# Altium PCB MP3_Player.PcbDoc (part 1 of 2)
Units mm, origin at the board's own origin, x right, y up, seen from the top; angles counter-clockwise.
Board outline 65.25 x 90.42 mm, 2 copper layers (Top Layer, Bottom Layer), stack 1.581 mm thick; 93 components, 53 nets, 312 pads, 294 vias.
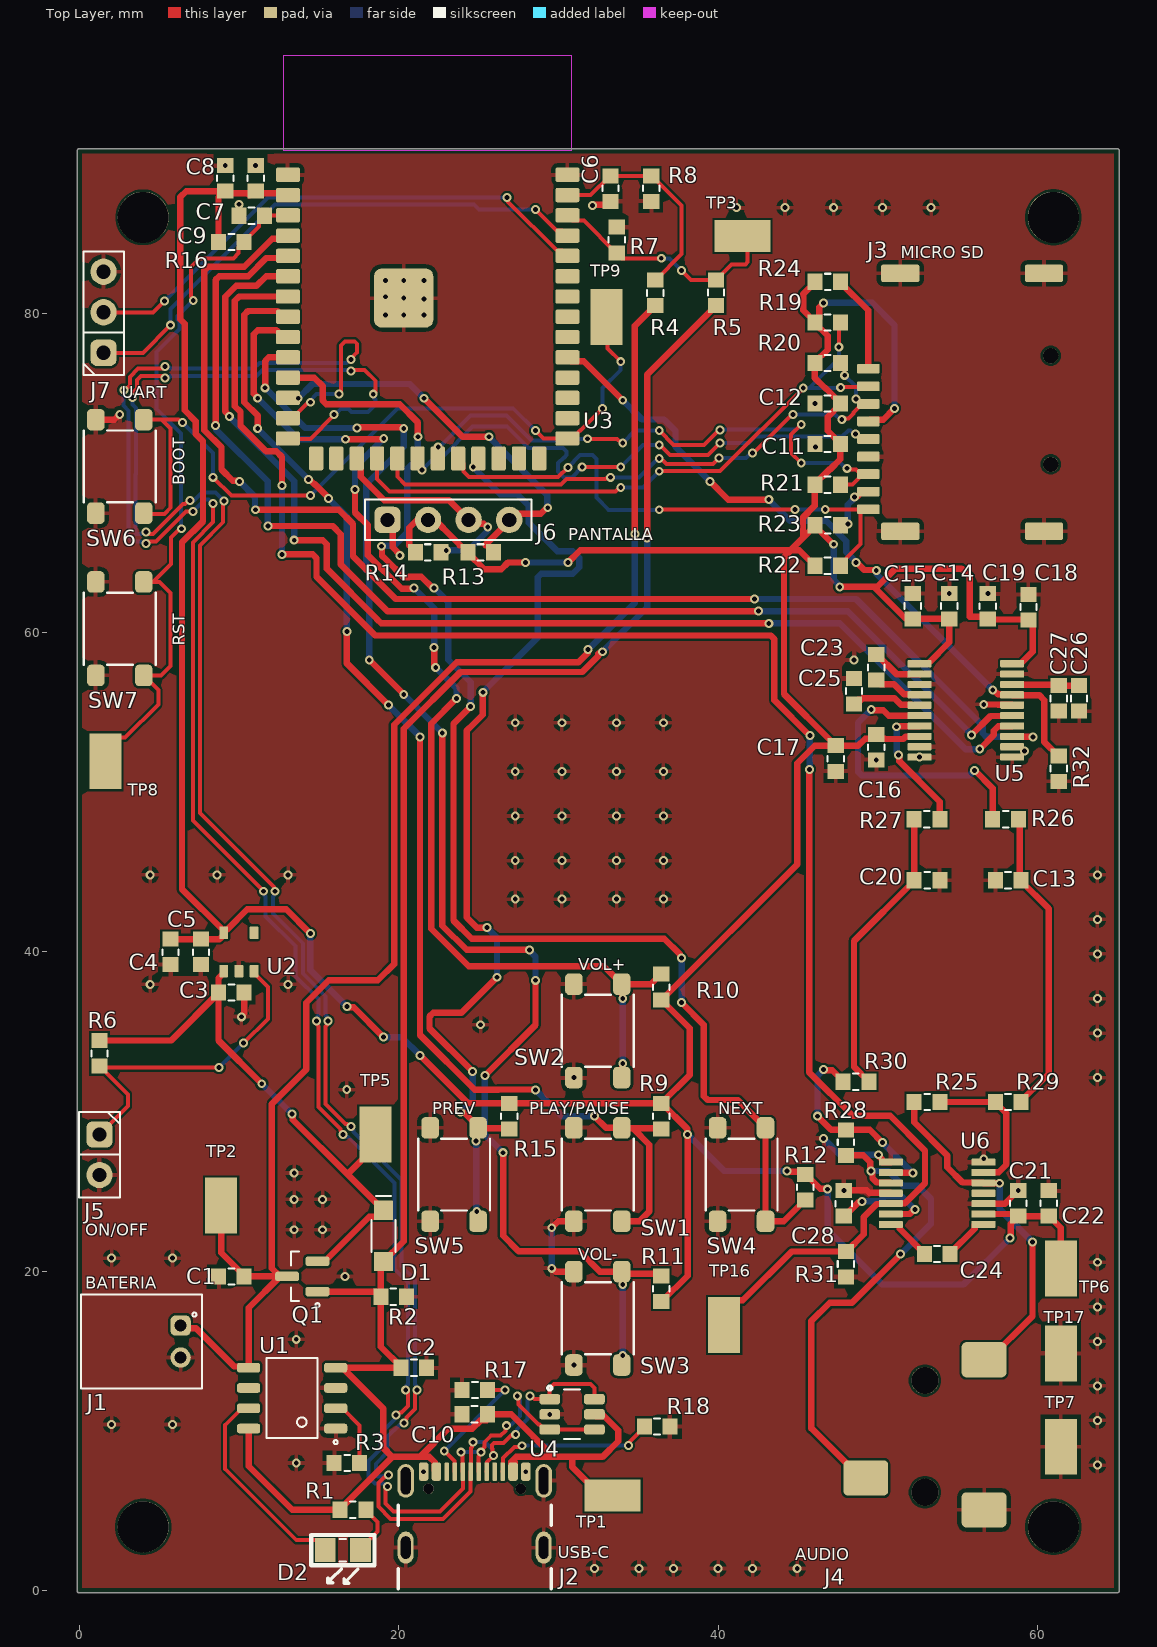
[diagram p0: Top Layer view]
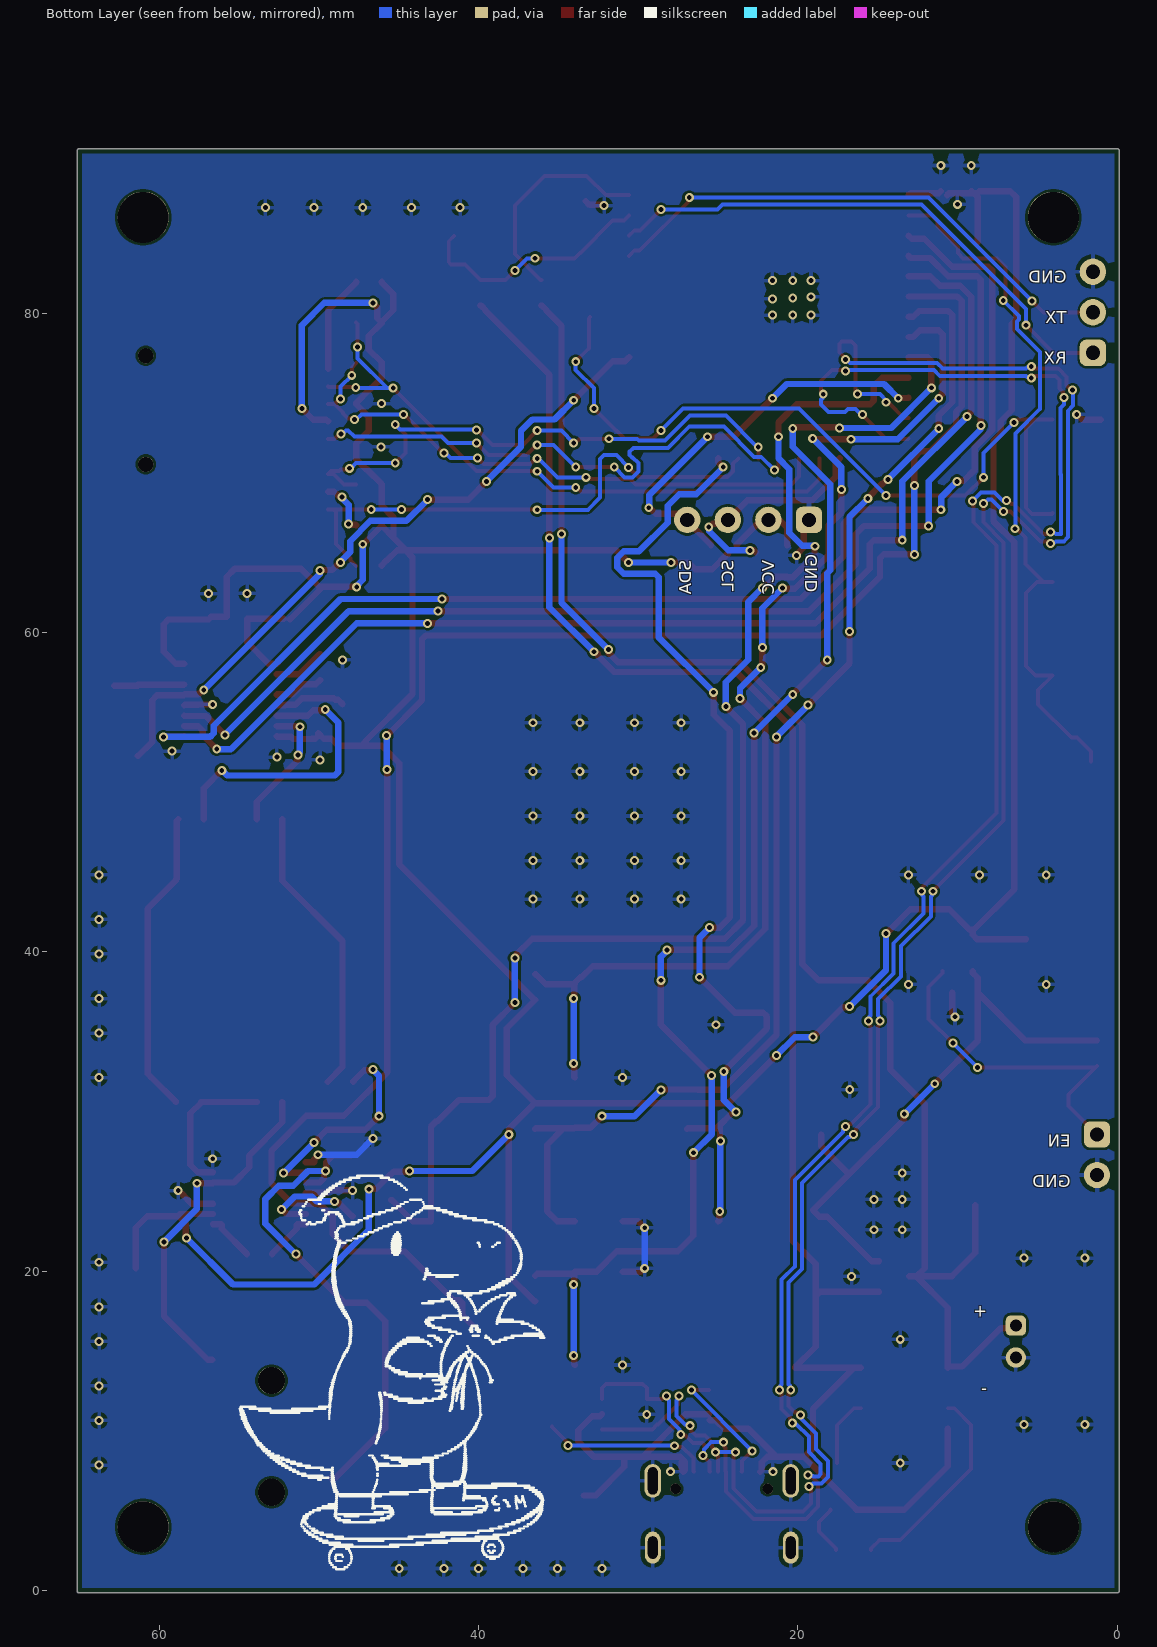
[diagram p1: Bottom Layer view, seen from below]
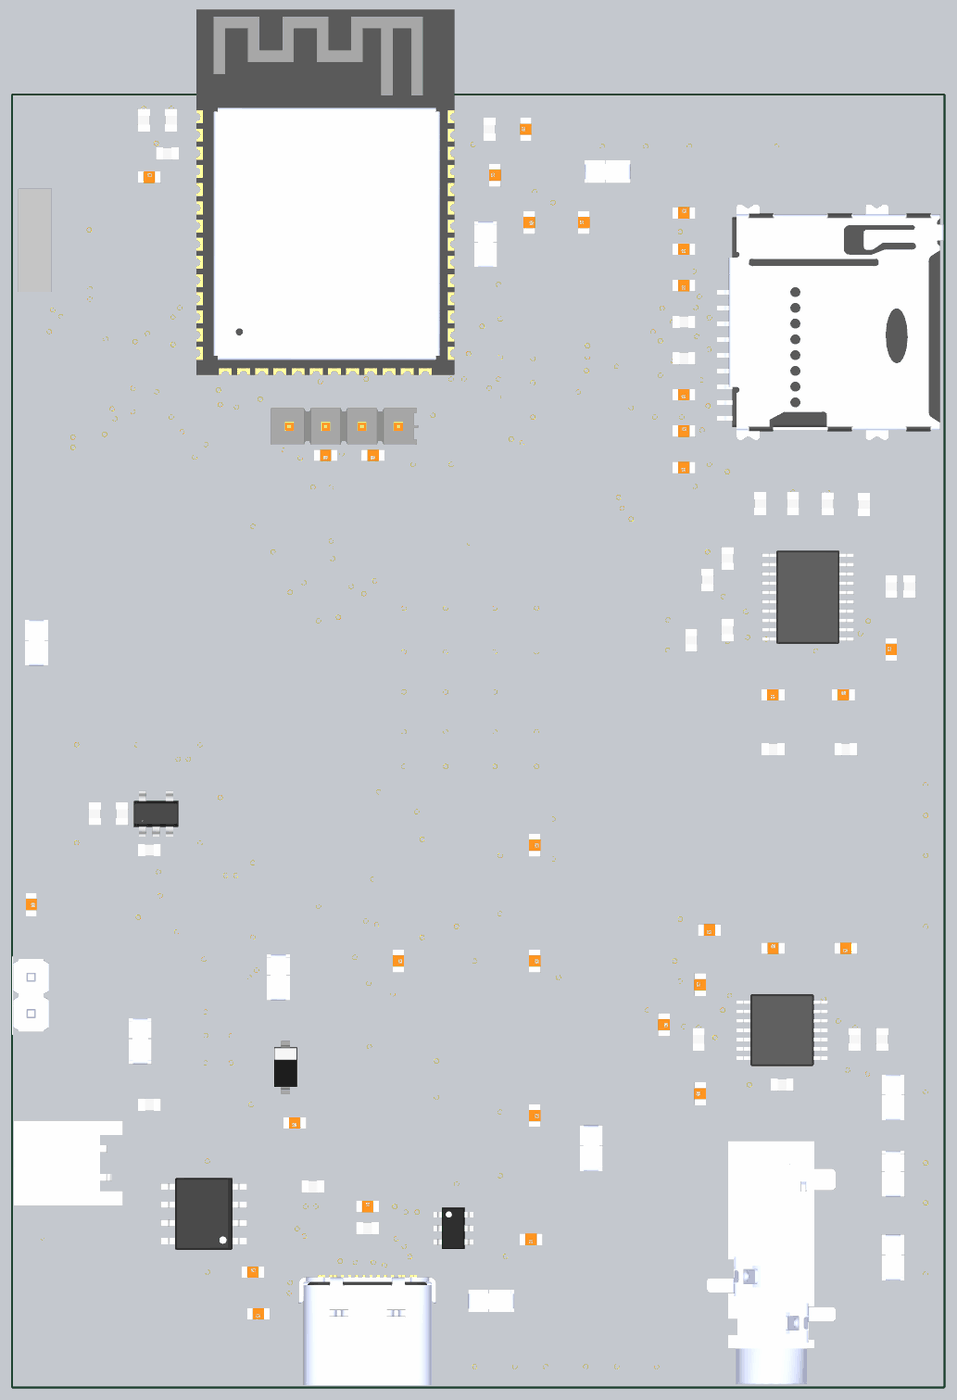
[diagram p3: 3D render of the assembled board from above, using the file's embedded part models]

## Layer stack, top to bottom
Top Solder: solder mask 0.0102, Solder Resist, Dk 3.5
Top Layer: signal copper 0.0356
Dielectric 1: dielectric 1.51, FR-4, Dk 4.8
Bottom Layer: signal copper 0.0356
Bottom Solder: solder mask 0.0102, Solder Resist, Dk 3.5

## Board outline
0,-0.127 cw(c0,0) -0.127,0 -0.127,90.17 cw(c0,90.17) 0,90.297 65,90.297 cw(c65,90.17) 65.127,90.17 65.127,0 cw(c65,0) 65,-0.127

## Design rules (kind name [scope] priority, off if disabled: settings)
BoardOutlineClearance BoardOutline_EdgeParts [InComponent('U3') or InComponent('J1') or InComponent('J2') or InComponent('J3') or InComponent('J4') or InComponent('J5')] p1: gap=0 ignorepadtopadclearanceinfootprint=FALSE
BoardOutlineClearance [All] p2: gap=0.3 ignorepadtopadclearanceinfootprint=FALSE
Clearance Clearance_USB [InComponent('J2')] p1: gap=0.15 ignorepadtopadclearanceinfootprint=FALSE
Clearance [All] p2: gap=0.152 ignorepadtopadclearanceinfootprint=FALSE
DiffPairsRouting DiffPair_USB [InDifferentialPair('USB')] p1: maxlimit=0.2 minlimit=0.2 mostfreqgap=0.2 toplayer_minwidth=0.25 toplayer_maxwidth=0.25 toplayer_prefwidth=0.25 bottomlayer_minwidth=0.25 bottomlayer_maxwidth=0.25 bottomlayer_prefwidth=0.25 maxuncoupledlength=50
HoleSize [All] p1: absolutevalues=TRUE maxlimit=5.08 minlimit=0.305 maxpercent=80.000 minpercent=20.000
MinimumSolderMaskSliver [All] p1: minsoldermaskwidth=0.076
PolygonConnect PolygonConnect_Vias [IsVia] p1: thpad.connectstyle=Direct thpad.reliefconductorwidth=0.254 thpad.reliefentries=4 thpad.polygonreliefangle="90 Angle" thpad.airgapwidth=0.254 smdpad.connectstyle=Relief smdpad.reliefconductorwidth=0.254 smdpad.reliefentries=4 smdpad.polygonreliefangle="90 Angle" smdpad.airgapwidth=0.254 via.connectstyle=Relief via.reliefconductorwidth=0.254 via.reliefentries=4 via.polygonreliefangle="90 Angle" via.airgapwidth=0.254
PolygonConnect [All] p2: connectstyle=Relief reliefconductorwidth=0.254 reliefentries=4 polygonreliefangle="90 Angle" airgapwidth=0.254
RoutingVias [All] p1: holewidth=0.305 width=0.559 viastyle="Through Hole" minholewidth=0.305 minwidth=0.457 maxholewidth=0.762 maxwidth=1.016
SilkToSilkClearance [All] p1: silktosilkclearance=0.051
SilkToSolderMaskClearance [IsPad] p1: minsilkscreentomaskgap=0.05 clearancetoexposedcopper=TRUE
SolderMaskExpansion SolderMaskExpansion_Via [isvia] p1: expansion=0.051 istentingtop=TRUE
SolderMaskExpansion [All] p2: expansion=0.051 istentingtop=FALSE
SupplyNets "Schematic Supply Nets_4" [InNet('VBUS')] p1: voltage=0.000
SupplyNets "Schematic Supply Nets_3" [InNet('+3V3')] p2: voltage=0.000
SupplyNets "Schematic Supply Nets_2" [InNet('VBAT')] p3: voltage=0.000
SupplyNets "Schematic Supply Nets_1" [InNet('GND')] p4: voltage=0.000
SupplyNets "Schematic Supply Nets" [InNet('EN')] p5: voltage=0.000
Width Width_Power [InNet('VBUS') or InNet('VBAT') or InNet('VSYS') or InNet('+3V3')] p1: maxlimit=1.5 minlimit=0.4 preferedwidth=0.6
Width Width_GND [InNet('GND')] p2: maxlimit=1.5 minlimit=0.4 preferedwidth=0.5
Width [All] p3: maxlimit=1 minlimit=0.152 preferedwidth=0.25
25 further rules are at their usual default settings.

## Classes and differential pairs
component class U_60_User_Interface: J6 R9 R10 R11 R12 R13 R14 R15 SW1 SW2 SW3 SW4 SW5
component class U_50_Audio_Codec: C13 C14 C15 C16 C17 C18 C19 C20 C21 C22 C23 C24 C25 C26 C27 C28 J4 R25 R26 R27 R28 R29 R30 R31 R32 TP16 TP17 U5 U6
component class U_40_Storage: C11 C12 J3 R19 R20 R21 R22 R23 R24
component class U_30_USB_Interface: C10 J2 R17 R18 U4
component class U_20_MCU_Core: C7 C8 C9 J7 R16 SW6 SW7 TP8 TP9 U3
component class U_10_Power_Management: C1 C2 C3 C4 C5 C6 D1 D2 J1 J5 Q1 R1 R2 R3 R4 R5 R6 R7 R8 TP1 TP2 TP3 TP5 TP6 TP7 U1 U2
differential pair USB: +USB_DP -USB_DN

## Components (designator, comment, footprint, x,y, rotation, side; value= is the part's Value field where it differs from the comment)
C1 "10uF 10V" 0603_cap 9.525,19.685 r0 top value=10uF
C2 "10uF 10V" 0603_cap 20.955,13.97 r0 top value=10uF
C3 "10uF 10V" 0603_cap 9.525,37.465 r0 top value=10uF
C4 "10uF 10V" 0603_cap 5.715,40.005 r270 top value=10uF
C5 "0.1uF 50V" 0603_cap 7.62,40.005 r270 top value=0.1uF
C6 "0.1uF 50V" 0603_cap 33.274,87.804 r90 top value=0.1uF
C7 "0.1uF 50V" 0603_cap 11.049,88.439 r90 top value=0.1uF
C8 "10uF 10V" 0603_cap 9.144,88.439 r90 top value=10uF
C9 "1uF 50V" 0603_cap 10.795,86.106 r180 top value=1uF
C10 "0.1uF 50V" 0603_cap 24.765,11.049 r180 top value=0.1uF
C11 "0.1uF 50V" 0603_cap 46.863,71.802 r180 top value=0.1uF
C12 "10uF 10V" 0603_cap 46.863,74.342 r180 top value=10uF
C13 "2.2nF" 0603_cap 58.166,44.497 r180 top
C14 "0.1uF 50V" 0603_cap 54.483,61.658 r90 top value=0.1uF
C15 "10uF 10V" 0603_cap 52.197,61.658 r90 top value=10uF
C16 "0.1uF 50V" 0603_cap 49.911,52.832 r270 top value=0.1uF
C17 "10uF 10V" 0603_cap 47.371,52.117 r270 top value=10uF
C18 "0.1uF 50V" 0603_cap 59.436,61.595 r90 top value=0.1uF
C19 "10uF 10V" 0603_cap 56.896,61.642 r90 top value=10uF
C20 "2.2nF" 0603_cap 53.086,44.497 r0 top
C21 "0.1uF 50V" 0603_cap 58.801,24.257 r90 top value=0.1uF
C22 "1uF 50V" 0603_cap 60.706,24.257 r90 top value=1uF
C23 "2.2uF" 0603_cap 49.911,57.832 r270 top
C24 "1uF 50V" 0603_cap 53.721,21.082 r180 top value=1uF
C25 "2.2uF" 0603_cap 48.514,56.325 r90 top
C26 "10uF 10V" 0603_cap 62.611,55.88 r270 top value=10uF
C27 "0.1uF 50V" 0603_cap 61.341,55.88 r270 top value=0.1uF
C28 "1uF 50V" 0603_cap 47.879,24.257 r270 top value=1uF
D1 "40V 1A" SOD_123 19.05,22.225 r270 top
D2 "2V" 0805_LED 16.51,2.54 r180 top
J1 "Connector 2pos" CON_2x1_TH_2MM 6.35,15.605 r270 top
J2 "USB C" CON_USB_C_16P_RA 24.765,5.08 r0 top
J3 "MEM2075-00-140-01-A" MicroSD_GCT_MEM2075-00-140-01-A 54.913,74.417 r90 top
J4 "SJ-3523-SMT" Jack_3.5mm_SameSky_SJ-3523-SMT 52.959,2.667 r0 top
J5 "2x1" H_2x1_TH_100mil 1.27,27.305 r270 top
J6 "4x1" H_4x1_TH_2.54mm 23.114,67.056 r0 top
J7 "3x1" H_3X1_TH_100mil 1.524,80.057 r90 top
Q1 "P CH" SOT_23_3 13.97,19.685 r180 top
R1 "1k 1/10W" 0603_res 17.145,5.08 r180 top value=1k
R2 "49k9 1/10W" 0603_res 19.685,18.415 r180 top value=49k9
R3 "4k7 1/10W" 0603_res 16.764,8.001 r0 top value=4k7
R4 "390k 1/10W" 0603_res 36.068,81.28 r270 top value=390k
R5 "390k 1/10W" 0603_res 39.878,81.28 r90 top value=390k
R6 "10k 1/10W" 0603_res 1.27,33.655 r270 top value=10k
R7 "390k 1/10W" 0603_res 33.655,84.582 r90 top value=390k
R8 "390k 1/10W" 0603_res 35.814,87.804 r90 top value=390k
R9 "10k 1/10W" 0603_res 36.449,29.718 r270 top value=10k
R10 "10k 1/10W" 0603_res 36.449,37.808 r270 top value=10k
R11 "10k 1/10W" 0603_res 36.449,18.923 r270 top value=10k
R12 "10k 1/10W" 0603_res 45.466,25.273 r270 top value=10k
R13 "4k7 1/10W" 0603_res 25.146,65.024 r180 top value=4k7
R14 "4k7 1/10W" 0603_res 21.844,65.024 r180 top value=4k7
R15 "10k 1/10W" 0603_res 26.924,29.718 r270 top value=10k
R16 "10k 1/10W" 0603_res 9.525,84.455 r0 top value=10k
R17 "4k7 1/10W" 0603_res 24.765,12.573 r0 top value=4k7
R18 "4k7 1/10W" 0603_res 36.195,10.287 r180 top value=4k7
R19 "10k 1/10W" 0603_res 46.863,79.422 r180 top value=10k
R20 "10k 1/10W" 0603_res 46.863,76.882 r180 top value=10k
R21 "10k 1/10W" 0603_res 46.863,69.262 r180 top value=10k
R22 "10k 1/10W" 0603_res 46.863,64.182 r180 top value=10k
R23 "10k 1/10W" 0603_res 46.863,66.722 r0 top value=10k
R24 "10k 1/10W" 0603_res 46.863,81.962 r0 top value=10k
R25 "10k 1/10W" 0603_res 53.086,30.607 r0 top value=10k
R26 "470R" 0603_res 58.001,48.307 r0 top
R27 "470R" 0603_res 53.086,48.307 r180 top
R28 "10k 1/10W" 0603_res 48.006,28.067 r90 top value=10k
R29 "10k 1/10W" 0603_res 58.166,30.607 r180 top value=10k
R30 "10k 1/10W" 0603_res 48.641,31.877 r180 top value=10k
R31 "100k" 0603_res 48.006,20.447 r90 top
R32 "10k 1/10W" 0603_res 61.341,51.482 r90 top value=10k
SW1 "Sw" Sw_PUSH_4.5x4.5x5mm 32.474,26.063 r90 top
SW2 "Sw" Sw_PUSH_4.5x4.5x5mm 32.474,35.063 r90 top
SW3 "Sw" Sw_PUSH_4.5x4.5x5mm 32.474,17.063 r90 top
SW4 "Sw" Sw_PUSH_4.5x4.5x5mm 41.474,26.063 r90 top
SW5 "Sw" Sw_PUSH_4.5x4.5x5mm 23.474,26.063 r90 top
SW6 "Sw" Sw_PUSH_4.5x4.5x5mm 2.54,70.405 r90 top
SW7 "Sw" Sw_PUSH_4.5x4.5x5mm 2.54,60.245 r270 top
TP1 "Test Point" "Test Point" 33.401,5.969 r180 top
TP2 "Test Point" "Test Point" 8.89,24.13 r90 top
TP3 "Test Point" "Test Point" 41.529,84.836 r180 top
TP5 "Test Point" "Test Point" 18.542,28.575 r90 top
TP6 "Test Point" "Test Point" 61.468,20.193 r90 top
TP7 "Test Point" "Test Point" 61.468,9.017 r90 top
TP8 "Test Point" "Test Point" 1.651,51.943 r90 top
TP9 "Test Point" "Test Point" 33.02,79.756 r90 top
TP16 "Test Point" "Test Point" 40.386,16.637 r90 top
TP17 "Test Point" "Test Point" 61.468,14.859 r90 top
U1 "4.2V 1A" SOIC_8_3.9mm 13.335,12.065 r180 top
U2 "AP2112K-3.3TRG1" SOT-23-5 10,40 r0 top
U3 "ESP32-S3-WROOM-1-N16R8" ESP32-S3-WROOM-1 21.82,79.786 r0 top
U4 "USBLC6-2SC6" SOT_23_6 30.861,11.049 r0 top
U5 "PCM5102APWR" TSSOP-20_4.4x6.5mm_P0.65mm 55.521,55.127 r0 top
U6 "TPA6138A2PWR" TSSOP-14_4.4x5mm_P0.65mm 53.721,24.892 r0 top

## Footprints (in the part's own frame and the unit in brackets; to place one, negate y for a bottom-side part, rotate by r counter-clockwise, add the part's x,y. Pads: shape width x height; smd on the part's side, far side on the other; paste and mask are expansions set on the pad)
0603_cap [mil]
  rect 37x40 smd: 1(-31.5,0) 2(31.5,0)
  silkscreen extent -6,-20 8,20, body extent -31,-17 31,17, height 34
0603_res [mil] "1608 Metric / 20190225 / C-A.Serna.A"
  rect 37x40 smd: 1(-31.5,0) 2(31.5,0)
  silkscreen extent -7,-20 8,20, body extent -31,-16 32,16, height 12
0805_LED [mm]
  rect 1.3x1.5 smd: 1(-1.1,0) 2(1.1,0)
  silkscreen extent -1.98,-0.97 1.98,2.07, body extent -1,-0.62 1,0.63, height 1.1
CON_2x1_TH_2MM [mm] "/20190307/N-A.Potosi"
  rrect50% 1.27x1.27 hole 0.762: 1(-1,0)
  round 1.27 hole 0.762: 2(1,0)
  silkscreen extent -2.95,-6.25 2.95,1.35, body extent -2.96,-6.27 2.94,1.33, height 4.8
CON_USB_C_16P_RA [mm]
  oval 1x2 hole 0.6 slot 1.4 at 90 deg: 0(-4.32,-2.377) 0(4.32,-2.377)
  oval 1.05x2.1 hole 0.6 slot 1.7 at 90 deg: 0(-4.32,1.803) 0(4.32,1.803)
  rrect50% 0.6x1.15 smd: A1/B12(-3.2,2.378) A4/B9(-2.4,2.378) B1/A12(3.2,2.378) B4/A9(2.4,2.378)
  rrect50% 0.3x1.15 smd: A5(-1.25,2.378) A6(-0.25,2.378) A7(0.25,2.378) A8(1.25,2.378) B5(1.75,2.378) B6(0.75,2.378) B7(-0.75,2.378) B8(-1.75,2.378)
  round 0.65 hole 0.65 unplated: ""(-2.89,1.303) ""(2.89,1.303)
  silkscreen extent -4.79,-4.98 4.79,0.27, body extent -4.79,-4.98 4.79,2.73, height 3.31
ESP32-S3-WROOM-1 [mm] "Espressif ESP32-S3-WROOM-1 module, 18x25.5mm, 41 pads; land pattern per datasheet v1.8 Fig.11-1. Keep copper out of antenna area."
  rrect25% 1.5x0.9 smd: 1(-8.75,8.88) 2(-8.75,7.61) 3(-8.75,6.34) 4(-8.75,5.07) 5(-8.75,3.8) 6(-8.75,2.53) 7(-8.75,1.26) 8(-8.75,-0.01) 9(-8.75,-1.28) 10(-8.75,-2.55) 11(-8.75,-3.82) 12(-8.75,-5.09) 13(-8.75,-6.36) 14(-8.75,-7.63) 27(8.75,-7.63) 28(8.75,-6.36) 29(8.75,-5.09) 30(8.75,-3.82) 31(8.75,-2.55) 32(8.75,-1.28) 33(8.75,-0.01) 34(8.75,1.26) 35(8.75,2.53) 36(8.75,3.8) 37(8.75,5.07) 38(8.75,6.34) 39(8.75,7.61) 40(8.75,8.88)
  rrect25% 0.9x1.5 smd: 15(-6.985,-8.88) 16(-5.715,-8.88) 17(-4.445,-8.88) 18(-3.175,-8.88) 19(-1.905,-8.88) 20(-0.635,-8.88) 21(0.635,-8.88) 22(1.905,-8.88) 23(3.175,-8.88) 24(4.445,-8.88) 25(5.715,-8.88) 26(6.985,-8.88)
  rrect25% 3.7x3.7 smd: 41(-1.5,1.16)
  Top Layer keep-out region: -9,16.37 9,16.37 9,10.37 -9,10.37
  body extent -9,-9.13 9,16.37, height 3.26
H_2x1_TH_100mil [mil]
  rrect50% 65x65 hole 35: 1(-50,0)
  round 65 hole 35: 2(50,0)
  silkscreen extent -105,-50 105,50, body extent -101,-49 99,49, height 339
H_3X1_TH_100mil [mil]
  rrect50% 65x65 hole 35: 1(-100,0)
  round 65 hole 35: 2(0,0) 3(100,0)
  silkscreen extent -155,-50 150,50, body extent -142,-46 142,46, height 320
H_4x1_TH_2.54mm [mil]
  rrect50% 65x65 hole 35: 1(-150,0)
  round 65 hole 35: 2(-50,0) 3(50,0) 4(150,0)
  silkscreen extent -205,-50 205,50, body extent -200,-50 205,50, height 420
Jack_3.5mm_SameSky_SJ-3523-SMT [mm] "Same Sky SJ-3523-SMT 3.5mm stereo jack: 1=sleeve 2=tip 3=ring (datasheet 04/15/2025). Barrel faces -Y."
  rrect25% 2.8x2.2 smd: 1(3.7,2.4) 2(3.7,11.8) 3(-3.7,4.4)
  round 1.7 / inner round 0 / far side round 1.7 hole 1.7 unplated: NP1(0,3.5) NP2(0,10.5)
  body extent -4.5,-2.5 4.5,14.5, height 5.01
MicroSD_GCT_MEM2075-00-140-01-A [mm] "GCT MEM2075 microSD push-push, 1.4mm profile, normally-open card detect CD to shell (G). Drawing rev A1. Card inserts from -Y edge."
  rrect25% 0.62x1.4 smd: 1(2.105,5.5) 2(1.005,5.5) 3(-0.095,5.5) 4(-1.195,5.5) 5(-2.295,5.5) 6(-3.395,5.5) 7(-4.495,5.5) 8(-5.595,5.5) CD(-6.695,5.5)
  rrect25% 1.1x2.4 smd: G1(-8.075,3.5) G2(-8.075,-5.5) G3(8.075,3.5) G4(8.075,-5.5)
  round 0.95 / inner round 0 / far side round 0.95 hole 0.95 unplated: NP1(2.915,-5.92) NP2(-3.885,-5.92)
  body extent -8.31,-10.08 8.13,5.77, height 1.46
SOD_123 [mm]
  rect 1.2x1.2 smd: 1(-1.6,0) 2(1.6,0)
  silkscreen extent -2.5,-0.75 1,0.75, body extent -1.93,-0.8 1.77,0.8, height 1.28
SOIC_8_3.9mm [mm]
  rrect50% 1.45x0.6 smd: 1(-2.725,1.905) 2(-2.725,0.635) 3(-2.725,-0.635) 4(-2.725,-1.905) 5(2.725,-1.905) 6(2.725,-0.635) 7(2.725,0.635) 8(2.725,1.905)
  silkscreen extent -2.85,-2.5 1.6,2.88, body extent -3.01,-2.5 3.01,2.5, height 1.73
SOT-23-5 [mm] "SOT-23-5 / SOT25, land per Diodes AP2112 datasheet DS39724 (pads 0.55 x 0.80, rows 2.40, pitch 0.95). Used by AP2112K and MCP73831."
  rrect25% 0.55x0.8 smd: 1(-0.95,-1.2) 2(0,-1.2) 3(0.95,-1.2) 4(0.95,1.2) 5(-0.95,1.2)
  body extent -1.55,-1.6 1.55,1.6, height 1.45
SOT_23_3 [mm]
  rrect50% 1.5x0.6 smd: 1(-0.95,0.95) 2(-0.95,-0.95) 3(0.95,0)
  silkscreen extent -1.07,-1.55 0.7,1.92, body extent -0.7,-1.52 0.7,1.53, height 1.12
SOT_23_6 [mm]
  rrect50% 1.3x0.65 smd: 1(-1.4,0.95) 2(-1.4,0) 3(-1.4,-0.95) 4(1.4,-0.95) 5(1.4,0) 6(1.4,0.95)
  silkscreen extent -1.52,-1.55 0.5,1.78, body extent -1.5,-1.45 1.3,1.45, height 1.45
Sw_PUSH_4.5x4.5x5mm [mm]
  rrect50% 1.35x1.1 smd: 1(-2.925,1.5) 1(2.925,1.5) 2(-2.925,-1.5) 2(2.925,-1.5)
  silkscreen extent -2.25,-2.25 2.25,2.25, body extent -2.25,-2.25 2.25,2.25, height 5
"Test Point" [mm]
  rect 3.5x2 smd: 1(0,0)
  body extent -1.6,-0.8 1.6,0.8, height 2.01
TSSOP-14_4.4x5mm_P0.65mm [mm] "TI PW0014A TSSOP-14, 4.4 mm body, pitch 0.65; land per SLOS704B example board layout (pads 1.5 x 0.45, rows 5.8 mm)."
  rrect25% 1.5x0.45 smd: 1(-2.9,1.95) 2(-2.9,1.3) 3(-2.9,0.65) 4(-2.9,0) 5(-2.9,-0.65) 6(-2.9,-1.3) 7(-2.9,-1.95) 8(2.9,-1.95) 9(2.9,-1.3) 10(2.9,-0.65) 11(2.9,0) 12(2.9,0.65) 13(2.9,1.3) 14(2.9,1.95)
  body extent -3.2,-2.5 3.2,2.5, height 1.13
TSSOP-20_4.4x6.5mm_P0.65mm [mm] "TI PW0020A TSSOP-20, 4.4 mm body, pitch 0.65; land per SLAS859C example board layout (pads 1.5 x 0.45, rows 5.8 mm)."
  rrect25% 1.5x0.45 smd: 1(-2.9,2.925) 2(-2.9,2.275) 3(-2.9,1.625) 4(-2.9,0.975) 5(-2.9,0.325) 6(-2.9,-0.325) 7(-2.9,-0.975) 8(-2.9,-1.625) 9(-2.9,-2.275) 10(-2.9,-2.925) 11(2.9,-2.925) 12(2.9,-2.275) 13(2.9,-1.625) 14(2.9,-0.975) 15(2.9,-0.325) 16(2.9,0.325) 17(2.9,0.975) 18(2.9,1.625) 19(2.9,2.275) 20(2.9,2.925)
  body extent -3.2,-3.25 3.2,3.25, height 1.13

## Part data
C1 C2 C3 C4 C8 C12 C15 C17 C19 C26: library part Cap_10uF_0603_10V, "10V 10uF X5R ±10% 0603 Multilayer Ceramic Capacitors MLCC - SMD/SMT ROHS", Manufacturer=CCTC, Manufacturer Part Number=TCC0603X5R106K100CT, Supplier Part Number 1=C380314, ComponentLink1Description=LCSC, ComponentLink1URL=https://www.lcsc.com/product-detail/Multilayer-Ceramic-Capacitors-MLCC-SMD-SMT_CCTC-TCC0603X5R106K100CT_C380314.html, Supplier 1=LCSC
C5 C6 C7 C10 C11 C14 C16 C18 C21 C27: library part Cap_0.1uF_0603_50V, "50V 100nF Y5V -20%~+80% 0603 Multilayer Ceramic Capacitors MLCC - SMD/SMT ROHS", Manufacturer="Walsin Tech Corp", Manufacturer Part Number=0603F104Z500CT, Supplier Part Number 1=C83060, ComponentLink1Description=LCSC, ComponentLink1URL=https://www.lcsc.com/product-detail/Multilayer-Ceramic-Capacitors-MLCC-SMD-SMT_Walsin-Tech-Corp-0603F104Z500CT_C83060.html, Supplier 1=LCSC
C9 C22 C24 C28: library part Cap_1uF_0603_50V, "50V 1uF X5R ±10% 0603 Multilayer Ceramic Capacitors MLCC - SMD/SMT ROHS", Manufacturer="Samsung Electro-Mechanics", Manufacturer Part Number=CL10A105KB8NNNC, Supplier Part Number 1=C15849, ComponentLink1Description=LCSC, ComponentLink1URL=https://www.lcsc.com/product-detail/Multilayer-Ceramic-Capacitors-MLCC-SMD-SMT_Samsung-Electro-Mechanics-CL10A105KB8NNNC_C15849.html, Supplier 1=LCSC
C13 C20: library part Cap_2.2nF_0603_50V, "CAP CER 2.2 nF 50V X7R 0603", Manufacturer=TBD, ComponentLink1Description=TBD, ComponentLink1URL=TBD, Manufacturer Part Number=TBD, Supplier 1=TBD, Supplier Part Number 1=TBD
C23 C25: library part Cap_2.2uF_0603_10V, "CAP CER 2.2 µF 10V X5R 0603", Manufacturer=TBD, ComponentLink1Description=TBD, ComponentLink1URL=TBD, Manufacturer Part Number=TBD, Supplier 1=TBD, Supplier Part Number 1=TBD
D1: library part D_Schottky_40V_1A_SOD_123F, "DIODE SCHOTTKY 40V 1A SOD123F", Manufacturer="Shanghai Prisemi Elec", Manufacturer Part Number=PSBD1DF40V1H, Supplier Part Number 1=C110730, ComponentLink1Description=LCSC, ComponentLink1URL=https://www.lcsc.com/product-detail/Switching-Diode_Shanghai-Prisemi-Elec-PSBD1DF40V1H_C110730.html, Supplier 1=LCSC
D2: library part LED_0805_RED, "LED RED CLEAR 0805 SMD", Manufacturer=XINGLIGHT, Manufacturer Part Number=XL-2012SURC, Supplier Part Number 1=C965812, ComponentLink1Description=LCSC, ComponentLink1URL=https://www.lcsc.com/product-detail/Light-Emitting-Diodes-LED_XINGLIGHT-XL-2012SURC_C965812.html, Supplier 1=LCSC
J1: library part Con_2x1_TH_JST_2MM, "2POS 2MM", Manufacturer=JST, Manufacturer Part Number=S2B-PH-K-S(LF)(SN), Supplier Part Number 1=C173752, ComponentLink1Description=Digi-Key, ComponentLink1URL=https://lcsc.com/product-detail/Wire-To-Board-Connector_JST-S2B-PH-K-S-LF-SN_C173752.html, Supplier 1=LCSC
J2: library part CON_USB_TYPEC_16P, "3A USB 3.1 1 Surface Mount 16P Female -40℃~+85℃ Type-C SMD USB Connectors ROHS", Manufacturer="SHOU HAN", Manufacturer Part Number=TYPE-C-3.1-16PIN, Supplier Part Number 1=C7507405, ComponentLink1Description=LCSC, ComponentLink1URL=https://lcsc.com/product-detail/USB-Connectors_SHOU-HAN-TYPE-C-3-1-16PIN_C7507405.html, Supplier 1=LCSC
J3: "GCT MEM2075 microSD push-push socket. Normally-open card detect: CD closes to SHELL when a card is inserted.", Manufacturer=GCT, Datasheet="gct.co/files/drawings/mem2075.pdf rev A1", Manufacturer Part Number=MEM2075-00-140-01-A, Verification="Pinout and land pattern from datasheet; not yet built or tested"
J4: "Same Sky 3.5 mm stereo jack, SMT, no switch. 1 = sleeve, 2 = tip, 3 = ring.", Manufacturer="Same Sky (CUI Devices)", Manufacturer Part Number=SJ-3523-SMT-TR, Datasheet="sj-352x-smt.pdf dated 04/15/2025", Verification="Pinout and land pattern from datasheet; not yet built or tested"
J5: library part H_Male_2x1_TH_100mil, "H_Male_2x1_TH_100mil", ComponentLink1Description=LCSC
J6: library part H_Male_4x1_TH_100mil, "H_Male_4x1_TH_100mil", ComponentLink1Description=LCSC
J7: library part H_Male_3x1_TH_100mil, "H_Male_3x1_TH_100mil", ComponentLink1Description=LCSC
Q1: library part Q_PFET_30V_3A_SOT23, "MOSFET P-CH 20V 3A SOT23", Manufacturer="ALLPOWER(ShenZhen Quan Li Semiconductor)", Manufacturer Part Number=AP2301, Supplier Part Number 1=C385296, ComponentLink1Description=LCSC, ComponentLink1URL=https://www.lcsc.com/product-detail/MOSFETs_ALLPOWER-ShenZhen-Quan-Li-Semiconductor-AP2301_C385296.html, Supplier 1=LCSC
R1: library part Res_1k_0603_1/10W, "RES SMD 1k OHM 5% 1/10W 0603", Manufacturer=FOJAN, Manufacturer Part Number="FRC0603J102 TS", Supplier Part Number 1=C2907113, ComponentLink1Description=LCSC, ComponentLink1URL=https://www.lcsc.com/product-detail/Chip-Resistor-Surface-Mount_FOJAN-FRC0603J102-TS_C2907113.html, Supplier 1=LCSC
R2: library part Res_49k9_0603_1/10W, "100mW Thick Film Resistor 75V ±100ppm/℃ ±1% 49.9kΩ 0603 Chip Resistor - Surface Mount ROHS", Manufacturer=YAGEO, Manufacturer Part Number=RC0603FR-0749K9L, Supplier Part Number 1=C114624, ComponentLink1Description=LCSC, ComponentLink1URL=https://lcsc.com/product-detail/Chip-Resistor-Surface-Mount_YAGEO-RC0603FR-0749K9L_C114624.html, Supplier 1=LCSC
R3 R13 R14 R17 R18: library part Res_4k7_0603_1/10W, "100mW Thick Film Resistor 75V ±1% 4.7kΩ 0603 Chip Resistor - Surface Mount ROHS", Manufacturer=VO, Manufacturer Part Number=SCR0603F4K7, Supplier Part Number 1=C3016318, ComponentLink1Description=LCSC, ComponentLink1URL=https://lcsc.com/product-detail/Chip-Resistor-Surface-Mount_VO-SCR0603F4K7_C3016318.html, Supplier 1=LCSC
R4 R5 R7 R8: library part Res_390k_0603_1/10W, "100mW Thick Film Resistor 75V ±100ppm/℃ ±1% 390kΩ 0603 Chip Resistor - Surface Mount ROHS", Manufacturer=YAGEO, Manufacturer Part Number=RC0603FR-07390KL, Supplier Part Number 1=C137735, ComponentLink1Description=LCSC, ComponentLink1URL=https://lcsc.com/product-detail/Chip-Resistor-Surface-Mount_YAGEO-RC0603FR-07390KL_C137735.html, Supplier 1=LCSC
R6 R9 R10 R11 R12 R15 R16 R19 R20 R21 R22 R23 R24 R25 R28 R29 R30 R32: library part Res_10k_0603_1/10W, "RES SMD 10k OHM 5% 1/10W 0603", Manufacturer=FOJAN, Manufacturer Part Number=FRC0603J103TS, Supplier Part Number 1=C2930027, ComponentLink1Description=LCSC, ComponentLink1URL=https://www.lcsc.com/product-detail/Chip-Resistor-Surface-Mount_FOJAN-FRC0603J103TS_C2930027.html, Supplier 1=LCSC
R26 R27: library part Res_470R_0603_1/10W, "RES 470 Ω 1% 1/10W 0603", Manufacturer=TBD, ComponentLink1Description=TBD, ComponentLink1URL=TBD, Manufacturer Part Number=TBD, Supplier 1=TBD, Supplier Part Number 1=TBD
R31: library part Res_100k_0603_1/10W, "RES 100 kΩ 1% 1/10W 0603", Manufacturer=TBD, ComponentLink1Description=TBD, ComponentLink1URL=TBD, Manufacturer Part Number=TBD, Supplier 1=TBD, Supplier Part Number 1=TBD
SW1 SW2 SW3 SW4 SW5 SW6 SW7: library part Sw_PUSH_4.5x4.5x5.0xmm, "SWITCH TACTILE SPST-NO 0.05A 12V", Manufacturer=BZCN, Manufacturer Part Number=TSC015A05026A, Supplier Part Number 1=C2888509, ComponentLink1Description=LCSC, ComponentLink1URL=https://www.lcsc.com/product-detail/Tactile-Switches_BZCN-TSC015A05026A_C2888509.html, Last modified by=N-A.Potosi, Last modified date=20190222, Supplier 1=LCSC
TP1 TP2 TP3 TP5 TP6 TP7 TP8 TP9 TP16 TP17: "PC TEST POINT", Manufacturer="KOA Speer Electronics, Inc.", Manufacturer Part Number=RCWCTE
U1: library part IC_BAT_CHG_4.2V_1A, "-300mV~8V Lithium-ion/Polymer 1 1A ESOP-8 Battery Management ROHS", Manufacturer=YONGYUTAI, Manufacturer Part Number=TP4056, Supplier Part Number 1=C20199357, ComponentLink1Description=LCSC, ComponentLink1URL=https://lcsc.com/product-detail/Battery-Management_YONGYUTAI-TP4056_C20199357.html, Supplier 1=LCSC
U2: "Diodes AP2112 600 mA low-dropout 3.3 V regulator, SOT-23-5 (SOT25). EN high = on.", Manufacturer="Diodes Incorporated", Datasheet="DS39724 Rev. 2-2 (June 2017)", Manufacturer Part Number=AP2112K-3.3TRG1, Verification="Pinout and land pattern from datasheet; not yet built or tested"
U3: "ESP32-S3-WROOM-1 module, 16MB flash, 8MB octal PSRAM. IO35-IO37 are used by the PSRAM: leave unconnected.", Manufacturer="Espressif Systems", Datasheet="esp32-s3-wroom-1_wroom-1u_datasheet_en.pdf v1.8", Manufacturer Part Number=ESP32-S3-WROOM-1-N16R8, Verification="Pinout and land pattern from datasheet; not yet built or tested"
U4: library part TVS_5.25V_2CH_SOT_23_6, "TVS DIODE 5.25V 17V SOT23-6", Manufacturer=STMicroelectronics, Supplier Part Number 1=C7519, ComponentLink1Description=LCSC, ComponentLink1URL=https://www.lcsc.com/product-detail/ESD-Protection-Devices_STMicroelectronics-USBLC6-2SC6_C7519.html, Manufacturer Part Number=USBLC6-2SC6, Supplier 1=LCSC
U5: "TI PCM5102A 32-bit 384 kHz I2S stereo DAC, 2.1 Vrms ground-centred line output, TSSOP-20. Hardware control only (no I2C).", Manufacturer="Texas Instruments", Datasheet="SLAS859C (May 2015)", Manufacturer Part Number=PCM5102APWR, Verification="Pinout and land pattern from datasheet; not yet built or tested"
U6: "TI TPA6138A2 25 mW DirectPath ground-centred stereo headphone amp with adjustable gain, TSSOP-14. No output coupling capacitors needed.", Manufacturer="Texas Instruments", Datasheet="SLOS704B (Aug 2015)", Manufacturer Part Number=TPA6138A2PWR, Verification="Pinout and land pattern from datasheet; not yet built or tested"

## Free pads (board coordinates)
  round 3.2 hole 3.2 unplated: 21(4,4) 21(4,86) 21(61,4) 21(61,86)

## Via types
v1: diameter 0.559, hole 0.305, Top Layer to Bottom Layer, tented both sides, 294 vias

## Nets (pads, with @x,y where several pads share a name; then routed paths per layer and width w, separated by ;. In a path a pad name is that pad's centre, name@x,y a point inside that pad or via, vN(x,y) a via of type N, cw(c..) or ccw(c..) an arc to the next point about the centre after c; other vN are vias at no path point)
+3V3: C4.1 C5.1 C7.1 C8.1 C11.1 C12.1 C14.1 C15.1 C16.1 C17.1 C18.1 C19.1 C21.1 C22.1 J3.4 J6.2 R9.1 R10.2 R11.2 R12.1 R13.2 R14.2 R15.1 R16.1 R19.2 R20.2 R21.2 R22.2 R23.1 R24.1 TP6.1 U2.5 U3.2 U5.1 U5.8 U5.20 U6.9 | length 291.3
  Top Layer w0.4: C4.1@5.715,40.805 C5.1@7.62,40.805 8.78,40.805 9.05,41.075 U2.5@9.05,41.2 U2.5@9.05,41.325 ; R16.1@8.725,84.455 8.725,87.258 C8.1@8.984,87.517 ; C8.1@9.144,87.639 9.106,87.639 C8.1@8.984,87.517 ; C7.1@10.657,87.396 10.536,87.517 C8.1@8.984,87.517 ; C7.1@11.049,87.639 11.17,87.517 12.949,87.517 U3.2@13.07,87.396 ; v1(14.478,41.148) 12.954,42.672 10.522,42.672 9.25,41.4 9.125,41.4 U2.5@9.05,41.325 ; v1(16.764,36.576) 16.802,36.538 17.183,36.538 v1(19.05,34.671) ; R14.2@20.663,65.452 20.663,66.557 J6.2@21.717,67.611 ; v1(21.336,33.528) 24.346,30.518 R15.1@26.924,30.518 36.411,30.518 R9.1@36.449,30.518 38.227,32.296 38.227,35.23 R10.2@36.449,37.008 ; J6.2@21.844,67.484 23.838,65.49 23.838,65.452 ; R13.2@24.346,65.024 24.346,64.986 25.371,63.961 26.427,63.961 26.855,64.389 v1(27.94,64.389) ; v1(30.607,64.389) 31.369,65.151 44.577,65.151 ; R11.2@36.449,18.123 36.487,18.123 38.1,19.736 v1(38.1,28.575) ; R9.1@36.487,30.518 38.062,28.943 v1@38.062,28.575 ; R10.2@36.487,37.008 44.958,45.479 44.958,51.816 46.059,52.917 C17.1@47.333,52.917 ; v1(44.323,26.289) 44.361,26.251 45.288,26.251 R12.1@45.466,26.073 ; R12.1@45.504,26.073 46.393,25.184 46.825,25.184 v1(46.863,25.146) ; R22.2@46.063,64.182 46.063,64.22 45.793,64.49 45.755,64.49 45.094,65.151 44.577,65.151 ; R23.1@46.063,66.722 R23.1@46.063,66.684 ; R24.1@46.063,81.962 46.063,81.924 45.339,81.2 45.339,80.184 46.063,79.46 R19.2@46.063,79.422 ; v1(46.609,80.645) 46.333,80.369 46.333,79.692 R19.2@46.063,79.422 ; v1(47.244,65.532) 47.215,65.532 R23.1@46.063,66.684 ; v1(47.625,62.865) 49.755,62.865 ; J3.4@49.413,73.222 49.523,73.332 50.345,73.332 v1(51.054,74.041) ; C15.1@51.816,60.842 51.778,60.842 49.755,62.865 ; C15.1@52.197,60.858 C14.1@54.483,60.858 54.483,59.389 53.146,58.052 U5.1@52.621,58.052 U5.1@52.596,58.077 ; U5.8@52.621,53.502 52.596,53.477 51.738,53.477 51.601,53.34 50.453,53.34 50.431,53.362 50.219,53.362 50.025,53.556 50.025,53.708 49.679,53.362 49.213,53.362 48.768,52.917 C17.1@47.371,52.917 C17.1@47.333,52.917 ; U6.9@56.621,23.592 58.666,23.592 C21.1@58.801,23.457 ; v1(58.293,22.098) 58.331,22.136 58.331,22.987 58.493,23.149 58.493,23.187 58.763,23.457 C21.1@58.801,23.457 ; U5.20@58.421,58.052 58.946,58.052 59.706,58.812 59.706,60.525 C18.1@59.436,60.795 59.412,60.818 56.92,60.818 C19.1@56.896,60.842 56.734,61.004 55.753,61.004 55.753,63.5 55.245,64.008 51.117,64.008 49.974,62.865 49.755,62.865 ; TP6.1@61.468,20.193 61.468,22.733 60.744,23.457 C22.1@60.706,23.457 C21.1@58.801,23.457 ; C8.1@8.984,87.517 8.757,87.517 8.636,87.639 6.693,87.639 6.331,87.277 6.331,79.622 6.604,79.349 6.604,73.918 7.286,73.236 7.286,72.45 7.75,71.987 7.75,66.958 6.439,65.647 6.439,43.936 U2.5@9.05,41.325 ; 44.577,65.151 44.577,65.198 45.32,65.941 ; 44.577,65.151 44.133,64.706 44.133,56.156 47.063,53.225 47.063,53.187 C17.1@47.333,52.917 ; 45.32,65.941 R23.1@46.063,66.684 ; 45.32,65.941 45.32,67.211 46.063,67.954 R21.2@46.063,69.262 46.063,69.3 46.979,70.216 47.017,70.216 47.663,70.862 C11.1@47.663,71.802 47.663,71.84 46.863,72.64 46.863,73.504 47.663,74.304 C12.1@47.663,74.342 47.663,74.38 46.747,75.296 46.709,75.296 46.063,75.942 R20.2@46.063,76.882 46.063,76.92 46.863,77.72 46.863,78.584 46.063,79.384 R19.2@46.063,79.422
  Bottom Layer w0.4: v1(14.478,41.148) 14.478,38.862 v1(16.764,36.576) ; v1(19.05,34.671) 20.193,34.671 v1(21.336,33.528) ; v1(27.94,64.389) v1(30.607,64.389) ; v1(38.1,28.575) 40.386,26.289 v1(44.323,26.289) ; v1(46.609,80.645) 49.657,80.645 51.054,79.248 v1(51.054,74.041) ; v1(46.863,25.146) 46.863,22.606 50.292,19.177 55.372,19.177 v1(58.293,22.098) ; v1(47.244,65.532) 47.244,63.3 47.625,62.919 v1(47.625,62.865)
-INL: R25.2 R29.2 U6.13 | length 9.3
  Top Layer w0.4: R25.2@53.886,30.607 R29.2@57.366,30.607 57.366,30.569 58.039,29.896 58.039,26.67 57.586,26.217 56.646,26.217 U6.13@56.621,26.192
-INR: R28.2 R30.2 U6.2 | length 13.5
  Top Layer w0.4: v1(46.228,29.718) 47.079,28.867 R28.2@48.006,28.867 49.492,28.867 v1(50.292,28.067) ; v1(46.609,32.639) 46.647,32.601 47.155,32.601 47.841,31.915 R30.2@47.841,31.877 ; U6.2@50.821,26.192 50.836,26.177 52.182,26.177 v1(52.197,26.162)
  Bottom Layer w0.4: v1(46.228,29.718) 46.228,32.258 v1(46.609,32.639) ; v1(50.292,28.067) v1(52.197,26.162)
AMP_MUTE_N: R31.2 TP16.1 U3.7 U6.5 | length 111.2
  Top Layer w0.4: v1(12.7,64.897) 14.625,64.897 14.859,64.663 14.859,63.5 18.542,59.817 43.298,59.817 43.533,59.583 43.533,55.766 v1(45.752,53.546) ; v1(12.7,69.215) 12.7,70.993 12.339,71.354 11.7,71.354 10.098,72.956 10.098,73.823 9.739,74.182 9.739,80.772 10.013,81.046 U3.7@13.07,81.046 ; TP16.1@40.386,16.637 41.021,17.272 41.021,18.022 41.186,18.187 41.555,18.187 44.615,21.247 R31.2@48.006,21.247 ; v1(45.72,51.435) 45.72,32.454 48.437,29.737 50.781,29.737 52.959,27.559 52.959,25.522 51.704,24.267 50.846,24.267 U6.5@50.821,24.242 ; R31.2@48.044,21.247 49.126,22.329 49.126,23.405 49.938,24.217 U6.5@50.137,24.217 ; U6.5@50.137,24.217 50.271,24.217 U6.5@50.796,24.217
  Bottom Layer w0.4: v1(12.7,64.897) v1(12.7,69.215) ; v1(45.72,51.435) 45.752,51.467 v1(45.752,53.546)
BAT_ADC: C6.2 R4.1 R8.2 U3.39 | length 13.8
  Top Layer w0.25: U3.39@30.57,87.396 32.028,87.396 33.236,88.604 C6.2@33.274,88.604 R8.2@35.814,88.604 35.852,88.604 37.719,86.737 37.719,83.693 36.106,82.08 R4.1@36.068,82.08
BTN_DOWN_N: R10.1 SW2.2 U3.9 | length 72.8
  Top Layer w0.4: v1(11.176,74.676) 11.176,74.73 10.939,74.967 10.939,78.692 11.173,78.926 12.35,78.926 12.77,78.506 U3.9@13.07,78.506 ; v1(16.679,72.109) 19.029,72.109 v1(19.07,72.15) ; v1(17.272,68.961) 17.272,67.524 18.079,66.717 18.079,64.852 20.193,62.738 20.89,62.738 v1(20.955,62.803) ; v1(22.225,59.055) 22.225,57.966 22.322,57.869 v1(22.322,57.815) ; v1(23.622,55.88) 22.036,54.294 22.036,41.464 24.384,39.116 32.846,39.116 33.545,38.417 33.63,38.417 33.974,38.072 SW2.2@33.974,37.988 ; SW2.2@33.974,32.138 34.005,32.169 34.005,32.989 v1(34.036,33.02) ; v1(34.036,37.084) 34.005,37.115 34.005,37.957 SW2.2@33.974,37.988 ; R10.1@36.449,38.608 36.411,38.608 35.791,37.988 SW2.2@33.974,37.988
  Bottom Layer w0.4: v1(11.176,74.676) 13.743,72.109 v1(16.679,72.109) ; v1(17.272,68.961) 17.272,70.351 v1(19.07,72.15) ; v1(20.955,62.803) 22.225,61.533 v1(22.225,59.055) ; v1(22.322,57.815) 23.622,56.515 v1(23.622,55.88) ; v1(34.036,33.02) v1(34.036,37.084)
BTN_NEXT_N: R15.2 SW5.2 U3.23 | length 64
  Top Layer w0.4: v1(23.876,29.972) 23.914,29.934 24.113,29.934 24.974,29.072 24.878,28.977 24.878,28.193 v1(24.84,28.155) ; v1(24.638,32.512) 21.936,35.214 21.936,35.961 22.17,36.195 23.941,36.195 v1(26.162,38.416) ; v1(24.675,70.359) 24.684,70.359 24.995,70.67 U3.23@24.995,70.906 ; v1(24.892,23.749) 24.93,23.711 24.93,23.182 SW5.2@24.974,23.138 ; SW5.2@24.974,28.988 25.009,28.953 26.889,28.953 R15.2@26.924,28.918 ; v1(25.273,56.261) 25.273,54.864 24.384,53.975 24.364,53.975 24.257,53.868 24.257,42.164 24.892,41.529 25.524,41.529 v1(25.527,41.532)
  Bottom Layer w0.4: v1(23.876,29.972) 24.638,30.734 v1(24.638,32.512) ; v1(24.675,70.359) 26.372,68.662 27.432,68.662 28.15,67.945 28.15,66.885 29.945,65.089 30.897,65.089 31.307,64.679 31.307,64.099 30.897,63.689 28.936,63.689 28.702,63.455 28.702,59.69 v1(25.273,56.261) ; v1(24.84,28.155) 24.866,28.129 24.866,23.775 v1(24.892,23.749) ; v1(25.527,41.532) 26.162,40.897 v1(26.162,38.416)
BTN_PLAY_N: R11.1 SW3.2 U3.10 | length 89.5
  Top Layer w0.4: v1(11.639,75.328) 11.639,77.002 11.873,77.236 U3.10@13.07,77.236 ; v1(17.399,72.809) 17.437,72.847 17.579,72.847 17.581,72.85 20.1,72.85 20.14,72.809 20.282,72.809 v1(20.32,72.771) ; v1(18.161,58.293) v1(20.32,56.134) ; v1(22.736,53.721) 22.736,41.653 24.257,40.132 v1(28.194,40.132) ; v1(25.4,32.258) 28.575,35.433 v1(28.575,38.227) ; v1(26.543,27.432) 26.543,22.225 27.511,21.257 31.334,21.257 32.604,19.988 SW3.2@33.974,19.988 ; SW3.2@33.974,14.138 34.005,14.169 34.005,14.701 v1(34.036,14.732) ; v1(34.036,19.177) 34.005,19.208 34.005,19.754 34.106,19.856 36.317,19.856 R11.1@36.449,19.723
  Bottom Layer w0.4: v1(11.639,75.328) 14.159,72.809 v1(17.399,72.809) ; v1(18.161,58.293) 18.161,63.719 17.972,63.908 17.972,69.28 20.32,71.628 v1(20.32,72.771) ; v1(20.32,56.134) 20.321,56.134 v1(22.736,53.721) v1(22.736,53.721) ; v1(25.4,32.258) 25.4,28.575 v1(26.543,27.432) ; v1(28.194,40.132) 28.194,40.078 28.575,39.697 v1(28.575,38.227) ; v1(34.036,14.732) v1(34.036,19.177)
BTN_PREV_N: R12.2 SW4.2 U3.11 | length 84.1
  Top Layer w0.4: U3.11@13.07,75.966 14.712,75.966 15.24,75.438 15.24,74.529 15.474,74.295 20.066,74.295 21.209,73.152 v1(21.209,72.263) ; v1(18.923,65.405) 18.961,65.367 18.961,64.818 19.196,64.584 19.201,64.584 20.308,63.477 20.639,63.477 20.665,63.503 21.425,63.503 22.125,62.803 v1(22.225,62.803) ; v1(24.511,55.372) 23.436,54.297 23.436,41.969 24.573,40.832 36.638,40.832 37.619,39.851 37.619,39.778 37.719,39.678 v1(37.719,39.624) ; v1(37.719,36.83) 39.116,35.433 39.116,30.968 39.35,30.734 41.228,30.734 42.545,29.417 42.63,29.417 42.974,29.072 SW4.2@42.974,28.988 SW4.2@42.974,23.138 44.124,23.138 45.158,24.172 45.158,24.203 45.428,24.473 R12.2@45.466,24.473
  Bottom Layer w0.4: v1(18.923,65.405) 18.961,65.443 19.723,65.443 20.53,66.25 20.53,70.229 21.209,70.909 v1(21.209,72.263) ; v1(22.225,62.803) 23.114,61.914 23.114,58.293 24.511,56.896 v1(24.511,55.372) ; v1(37.719,36.83) v1(37.719,39.624)